# Altium PCB Bento_Pad_Plus_PCB.PcbDoc (part 3 of 3)
Units mm, origin at the board's own origin, x right, y up, seen from the top; angles counter-clockwise.
Board outline 279.4 x 81.28 mm, 2 copper layers (Top Layer, Bottom Layer), stack 1.57 mm thick; 149 components, 65 nets, 541 pads, 199 vias.
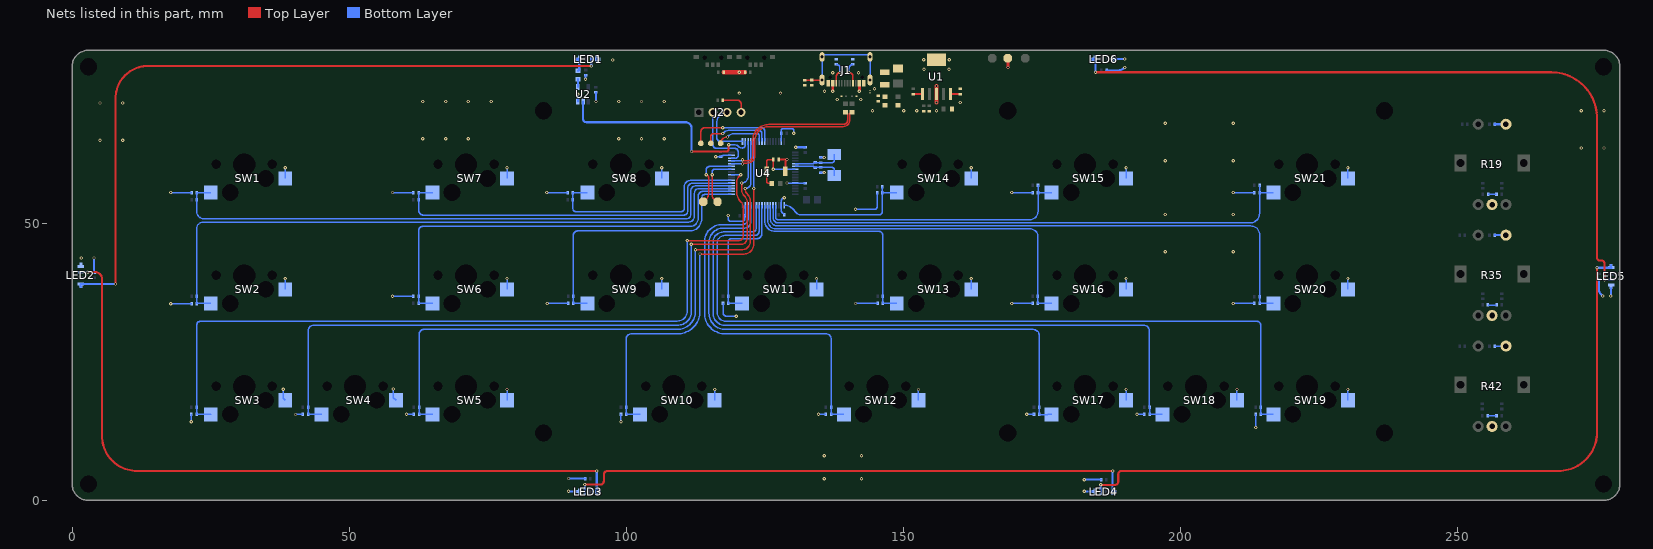
[diagram p2: the nets of this part, all layers, seen from the top]

## Via types
v1: diameter 0.6, hole 0.3, Top Layer to Bottom Layer, tented both sides, 199 vias

## Nets (pads, with @x,y where several pads share a name; then routed paths per layer and width w, separated by ;. In a path a pad name is that pad's centre, name@x,y a point inside that pad or via, vN(x,y) a via of type N, cw(c..) or ccw(c..) an arc to the next point about the centre after c; other vN are vias at no path point) (continued)
GND: C1.1 C2.2 C3.2 C4.1 C5.1 C6.1 C7.1 C8.1 C9.1 C10.1 C11.1 C12.1 C13.1 C14.1 C15.1 C16.1 C17.2 C18.2 C19.1 C20.1 C21.1 C22.1 C23.1 C24.1 C25.1 C26.1 C27.1 C28.1 C29.1 C30.1 C31.1 C32.1 C33.1 C34.1 C35.1 C36.1 C37.1 C38.1 C39.1 C40.1 C41.1 C42.1 C43.1 C44.1 C45.1 C46.1 C47.1 C48.1 C49.1 C50.1 C51.2 C53.2 C54.2 C57.2 C80.2 D1.2 D2.2 D3.2 J1.A1/B12 J1.B1/A12 J2.4 LED1.4 LED2.4 LED3.4 LED4.4 LED5.4 LED6.4 P3.1 R1.2 R2.2 R3.2 R7.2 R8.1 R19.C R19.W R35.C R35.W R42.C R42.W SW1.1 SW2.1 SW3.1 SW4.1 SW5.1 SW6.1 SW7.1 SW8.1 SW9.1 SW10.1 SW11.1 SW12.1 SW13.1 SW14.1 SW15.1 SW16.1 SW17.1 SW18.1 SW19.1 SW20.1 SW21.1 SW23.2 U1.3 U1.6 U2.3 U4.12 U4.18 U4.31 U4.47 U4.63 | length 185.1
  Top Layer w0.254: C13.1@117.564,72.263 120.091,72.263 cw(c120.091,71.591) 120.763,71.591 J2.4@120.763,70.053
  Top Layer w0.381: C80.2@127.525,61.545 v1(129.057,61.545) ccw(c129.788,60.815) 128.755,60.815 SW23.2@128.755,59.463
  Top Layer w0.508: v1(168.935,78.156) P3.1@168.935,79.781
  Top Layer w0.762: R8.1@117.609,77.292 v1(120.417,77.292) R7.2@121.477,77.292 ; v1(156.032,71.847) U1.3@156.032,73.354 ; U1.3@156.032,73.1 v1(156.032,74.803)
  Bottom Layer w0.254: v1(17.805,35.51) C16.1@21.589,35.51 ; v1(17.805,55.58) C15.1@21.589,55.58 ; v1(21.539,14.221) C25.1@21.539,15.54 ; v1(38.1,20.066) 38.1,18.455 SW3.1@38.475,18.08 ; SW2.1@38.475,38.1 v1(38.475,40.051) ; SW1.1@38.475,58.12 v1(38.475,60.071) ; v1(40.337,15.532) C26.1@41.656,15.532 ; v1(57.836,36.835) C28.1@61.62,36.835 ; v1(57.836,55.58) C29.1@61.62,55.58 ; v1(57.988,20.117) 57.988,18.586 SW4.1@58.494,18.08 ; v1(60.378,15.54) C27.1@61.697,15.54 ; SW5.1@78.515,18.08 v1(78.515,20.031) ; SW6.1@78.515,38.1 v1(78.515,40.051) ; SW7.1@78.515,58.12 v1(78.515,60.071) ; v1(85.674,55.58) C30.1@89.459,55.58 ; v1(85.775,35.56) C34.1@89.56,35.56 ; v1(99.085,14.221) C35.1@99.085,15.54 ; SW9.1@106.47,38.1 v1(106.47,40.051) ; SW8.1@106.47,58.12 v1(106.47,60.071) ; SW10.1@115.994,18.08 v1(115.994,20.031) ; v1(116.18,62.027) 116.18,62.036 C54.2@117.087,62.036 cw(c117.728,61.395) 117.728,62.301 U4.47@119.033,62.301 ; C36.1@117.5,35.56 117.5,33.96 ccw(c118.211,33.96) 118.211,33.249 v1(119.863,33.249) ; v1(118.439,51.431) 118.439,50.839 ccw(c118.885,50.839) 118.885,50.393 120.984,50.393 ccw(c120.984,50.852) 121.443,50.852 C53.2@121.443,51.431 ; C53.2@121.417,51.431 ccw(c121.417,51.547) 121.533,51.547 U4.31@121.533,53.301 ; U4.63@128.033,64.801 C51.2@128.033,66.544 ; C51.2@128.033,66.29 128.033,66.82 cw(c128.351,66.82) 128.351,67.137 129.965,67.137 cw(c129.965,66.852) 130.251,66.852 v1(130.251,66.29) ; C18.2@128.531,51.562 128.429,51.752 128.259,51.863 cw(c128.531,52.28) 128.033,52.28 U4.18@128.033,53.301 128.033,54.098 cw(c128.559,54.098) v1(128.559,54.624) ; v1(129.057,57.301) U4.12@130.533,57.301 132.263,57.301 ccw(c132.263,57.392) C57.2@132.327,57.328 ; SW11.1@134.383,38.1 v1(134.383,40.051) ; v1(134.749,15.54) C37.1@136.068,15.54 ; v1(141.402,35.56) 141.903,35.56 ; v1(141.402,52.545) 144.834,52.545 ccw(c144.834,53.025) 145.313,53.025 C39.1@145.313,55.58 ; v1@141.604,35.56 141.903,35.56 ; C38.1@145.389,35.56 141.903,35.56 ; SW12.1@152.774,18.08 v1(152.774,20.031) ; SW13.1@162.3,38.1 v1(162.3,40.051) ; SW14.1@162.3,58.12 v1(162.3,60.071) ; v1(169.596,35.56) C41.1@173.38,35.56 ; v1(169.632,55.58) C40.1@173.417,55.58 ; v1(172.316,15.54) C42.1@173.634,15.54 ; SW17.1@190.255,18.08 v1(190.255,20.031) ; SW16.1@190.255,38.1 v1(190.255,40.051) ; SW15.1@190.255,58.12 v1(190.255,60.071) ; v1(192.229,15.54) C43.1@193.548,15.54 ; v1(209.626,35.56) C45.1@213.411,35.56 ; v1(209.626,55.58) C46.1@213.411,55.58 ; SW18.1@210.275,18.08 v1(210.275,20.031) ; v1(213.639,13.157) C44.1@213.639,15.54 ; SW19.1@230.295,18.08 v1(230.295,20.031) ; SW20.1@230.295,38.1 v1(230.295,40.051) ; SW21.1@230.295,58.12 v1(230.295,60.071) ; C31.1@255.511,15.291 C33.1@257.111,15.291 ; C22.1@255.587,35.281 C24.1@257.111,35.281 ; C19.1@255.587,55.301 C21.1@257.111,55.301 ; C32.1@256.789,27.868 R42.W@258.819,27.868
  Bottom Layer w0.381: C11.1@3.968,41.13 v1(3.968,43.764) ; v1(89.611,1.637) LED3.4@91.073,1.637 ; v1(89.611,3.962) C12.1@92.634,3.962 ; U2.3@91.304,72.008 v1(91.304,73.308) ; v1(92.683,76.048) C10.1@92.683,76.759 ; v1(94.569,72.008) C9.1@94.569,73.668 ; LED1.4@94.708,79.718 ccw(c94.783,79.718) LED1.4@94.783,79.643 ; v1(130.632,63.754) 130.636,63.75 C17.2@132.327,63.75 ; C48.1@135.146,59.184 v1(135.763,59.184) ; C47.1@135.146,61.919 v1(135.763,61.919) ; v1(182.73,1.637) LED4.4@184.192,1.637 ; v1(182.73,3.759) C14.1@185.75,3.759 ; C50.1@186.741,77.622 188.704,77.622 ccw(c188.704,79.444) v1(189.992,78.156) ; LED6.4@187.827,79.718 ccw(c187.918,79.809) 187.918,79.681 v1(189.992,79.681) ; C23.1@256.789,47.888 R35.W@258.819,47.888 ; C20.1@256.789,67.908 R19.W@258.819,67.908 ; C49.1@275.488,39.94 275.592,39.94 275.615,39.916 275.615,38.044 ccw(c276.743,38.044) 275.946,37.247 v1(276.276,36.917) ; v1(277.763,36.917) LED5.4@277.763,38.379
  other v1: 135.763,3.937 142.493,3.937 135.763,8.047 142.493,8.047 1.637,43.764 197.312,44.878 209.626,44.878 197.312,51.608 209.626,51.608 197.312,61.342 209.626,61.342 272.415,63.628 276.525,63.628 5.034,65.025 9.144,65.025 63.317,65.278 67.427,65.278 71.537,65.278 98.679,65.278 102.789,65.278 106.899,65.278 197.312,68.072 209.626,68.072 144.482,70.333 150.147,70.333 152.479,70.333 156.032,70.333 272.415,70.358 276.525,70.358 5.034,71.755 9.144,71.755 160.325,71.847 63.317,72.008 67.427,72.008 71.537,72.008 75.647,72.008 98.679,72.008 102.789,72.008 106.899,72.008 138.108,72.362 142.351,72.362 120.417,73.533 127.889,73.533 135.833,73.89 144.831,74.295 137.308,77.216 141.949,77.216 153.767,77.813 158.297,77.813 97.612,79.502 153.746,79.554 158.318,79.554
LED_DO_3V3: U2.2 U4.50 | length 39.7
  Top Layer w0.381: v1(111.811,62.992) 118.11,62.992 ccw(c118.11,63.407) 118.525,63.407 v1(118.525,64.201)
  Bottom Layer w0.254: v1(118.525,64.201) 119.549,64.201 cw(c119.549,63.033) 120.375,63.859 120.376,63.858 120.377,63.857 ccw(c120.962,64.442) 120.962,63.615 ; 120.963,63.615 ccw(c120.962,64.186) 121.533,64.186 U4.50@121.533,64.801
  Bottom Layer w0.381: U2.2@92.254,72.008 92.254,68.858 ccw(c92.837,68.858) 92.837,68.275 110.744,68.275 cw(c110.744,67.208) 111.811,67.208 v1(111.811,62.992)
LED_DO_5V0: R39.1 U2.4 | length 1.4
  Bottom Layer w0.381: U2.4@91.304,74.608 R39.1@91.304,76.048
NetC1_2: C1.2 J1.S1 J1.S2 J1.S3 J1.S4 R1.1 | length 20.6
  Top Layer w0.254: C1.2@132.258,75.882 132.258,75.894 R1.1@133.488,75.894 J1.S1@135.383,75.894
  Bottom Layer w0.254: J1.S1@135.383,75.894 135.383,80.175 135.682,80.474 143.633,80.474 cw(c143.633,80.074) J1.S3@144.033,80.074 J1.S4@144.033,75.894
NetC7_2: C7.2 U1.5 | length 1.8
  Top Layer w0.381: U1.5@158.572,73.354 C7.2@160.325,73.354
NetF1_2: F1.2 FB1.1
NetJ1_A5: J1.A5 R2.1 | length 4.2
  Top Layer w0.254: v1(140.233,77.216) cw(c140.233,76.491) 140.958,76.491 J1.A5@140.958,75.324
  Bottom Layer w0.254: v1(140.233,77.216) 140.233,77.99 cw(c140.958,77.99) R2.1@140.958,78.715
NetJ1_B5: J1.B5 R3.1 | length 4.1
  Top Layer w0.254: J1.B5@137.958,75.324 137.958,76.566 cw(c138.608,76.566) v1(138.608,77.216)
  Bottom Layer w0.254: R3.1@137.958,78.715 cw(c137.958,78.065) 138.608,78.065 v1(138.608,77.216)
NetLED1_1: LED1.1 R39.2 | length 2.8
  Bottom Layer w0.381: LED1.1@91.073,79.643 91.483,79.643 ccw(c91.483,79.718) LED1.1@91.558,79.718 91.558,77.826 cw(c91.304,77.826) R39.2@91.304,77.572
NetLED1_3: LED1.3 LED2.1 | length 130.8
  Top Layer w0.381: v1(7.849,39.065) 7.849,72.577 cw(c13.707,72.577) 13.707,78.435 v1(93.708,78.435)
  Bottom Layer w0.381: LED2.1@1.637,38.58 cw(c1.637,38.655) 1.562,38.655 LED2.1@1.562,39.065 v1(7.849,39.065) ; v1(93.708,78.435) LED1.3@93.708,79.718
NetLED2_3: LED2.3 LED3.1 | length 130.1
  Top Layer w0.381: v1(2.819,41.215) 4.226,41.215 cw(c4.226,40.03) 5.41,40.03 5.41,11.648 ccw(c11.724,11.648) 11.724,5.334 v1(94.708,5.334)
  Bottom Layer w0.381: LED2.3@1.562,41.215 v1(2.819,41.215) ; v1(94.708,5.334) LED3.1@94.708,1.562 cw(c94.783,1.562) 94.783,1.637 LED3.1@95.193,1.637
NetLED3_3: LED3.3 LED4.1 | length 102.8
  Top Layer w0.381: v1(92.558,2.87) 95.377,2.87 ccw(c95.377,3.48) 95.987,3.48 95.987,4.674 cw(c96.647,4.674) 96.647,5.334 v1(187.827,5.334)
  Bottom Layer w0.381: LED3.3@92.558,1.562 v1(92.558,2.87) ; v1(187.827,5.334) LED4.1@187.827,1.562 cw(c187.902,1.562) 187.902,1.637 LED4.1@188.312,1.637
NetLED4_3: LED4.3 LED5.1 | length 129.7
  Top Layer w0.381: v1(185.674,2.819) 188.239,2.819 ccw(c188.239,3.429) 188.849,3.429 188.849,4.75 cw(c189.433,4.75) 189.433,5.334 268.317,5.334 ccw(c268.317,12.277) 275.26,12.277 v1(275.26,42.012)
  Bottom Layer w0.381: v1(185.674,2.819) 185.677,2.819 LED4.3@185.677,1.562 ; v1(275.26,42.012) 275.26,42.014 LED5.1@277.838,42.014 cw(c277.838,42.089) 277.763,42.089 LED5.1@277.763,42.499
NetLED5_3: LED5.3 LED6.1 | length 129.7
  Top Layer w0.381: v1@184.734,77.298 266.996,77.298 cw(c266.996,69.034) 275.26,69.034 275.26,43.828 ccw(c275.781,43.828) 275.781,43.307 276.097,43.307 cw(c276.097,42.798) 276.606,42.798 v1(276.606,39.864)
  Bottom Layer w0.381: LED6.1@184.192,79.643 LED6.1@184.734,79.643 ; LED6.1@184.677,79.643 LED6.1@184.734,79.643 ; LED6.1@184.677,79.718 cw(c184.677,79.661) LED6.1@184.734,79.661 ; v1(184.734,77.305) LED6.1@184.734,79.661 ; v1@276.555,39.864 LED5.3@277.838,39.864 ; LED6.1@184.734,79.643 LED6.1@184.734,79.661
NetR6_1: R6.1 U1.1 | length 1.7
  Top Layer w0.381: R6.1@151.83,73.354 U1.1@153.492,73.354
NetTP1_1: TP1.1 U4.55 | length 9.1
  Top Layer w0.254: TP1.1@117.081,64.457 cw(c118.221,64.457) 118.221,65.597 v1(118.307,65.597)
  Bottom Layer w0.254: v1(118.307,65.597) 118.452,65.741 cw(c119.633,64.56) 119.633,66.23 123.683,66.23 cw(c123.683,65.881) 124.033,65.881 U4.55@124.033,64.801
NetTP2_1: TP2.1 U4.56 | length 12.7
  Top Layer w0.254: TP2.1@115.291,64.457 115.291,65.659 cw(c115.862,65.659) 115.862,66.23 v1(117.47,66.23)
  Bottom Layer w0.254: v1(117.47,66.23) 117.744,66.505 cw(c118.433,65.817) 118.433,66.79 123.948,66.79 cw(c123.948,66.205) 124.533,66.205 U4.56@124.533,64.801
NetTP3_1: TP3.1 U4.57 | length 16.3
  Top Layer w0.254: TP3.1@113.5,64.457 113.5,66.54 cw(c114.244,66.54) 114.244,67.285 v1(117.47,67.285)
  Bottom Layer w0.254: v1(117.47,67.285) 124.421,67.285 cw(c124.421,66.673) 125.033,66.673 U4.57@125.033,64.801
OSC_IN: C47.2 R38.1 U4.5 X1.1 | length 8.4
  Bottom Layer w0.254: U4.5@130.533,60.801 133.754,60.801 ccw(c133.754,61.021) 133.849,60.823 133.902,60.876 133.946,60.92 R38.1@134.13,61.021 134.172,60.979 C47.2@135.146,60.979 137.128,60.979 ccw(c137.128,61.435) 137.584,61.435 X1.1@137.584,62.451
OSC_OUT: C48.2 R38.2 U4.6 X1.2 | length 8.5
  Bottom Layer w0.254: U4.6@130.533,60.301 133.754,60.301 cw(c133.754,60.081) 133.849,60.28 133.902,60.227 133.946,60.183 R38.2@134.13,60.081 ; X1.2@137.584,58.651 137.584,59.667 ccw(c137.128,59.667) 137.128,60.124 R38.2@134.172,60.124 ; R38.2@134.13,60.081 R38.2@134.172,60.124 ; R38.2@134.13,60.081 R38.2@134.172,60.124
RST: C80.1 R47.2 SW23.1 U4.7 | length 11.8
  Top Layer w0.254: R47.2@126.293,57.252 125.799,57.252 cw(c125.799,57.696) 125.355,57.696 SW23.1@125.355,59.463 125.355,61.098 cw(c125.802,61.098) 125.802,61.545 C80.1@126.585,61.545 v1(126.585,59.801)
  Bottom Layer w0.254: v1@126.533,59.801 U4.7@130.533,59.801
RX: P5.1 U4.43 | length 11.9
  Top Layer w0.254: P5.1@113.944,53.899 114.398,54.409 ccw(c113.944,55.232) 114.884,55.232 114.884,58.369 ; 114.884,58.369 ccw(c114.478,58.369) v1(114.478,58.776) cw(c114.478,58.369) 114.884,58.369
  Bottom Layer w0.254: v1(114.478,58.776) 114.478,59.693 cw(c115.086,59.693) 115.086,60.301 U4.43@119.033,60.301
SW#1: C15.2 R11.2 SW1.2 U4.36 | length 108.4
  Bottom Layer w0.254: SW1.2@25.025,55.58 C15.2@22.529,55.58 R11.2@22.529,54.305 22.529,52.045 ccw(c23.704,52.045) 23.704,50.87 110.985,50.87 ccw(c110.985,51.544) 111.658,51.544 111.658,55.795 cw(c112.665,55.795) 112.665,56.801 U4.36@119.033,56.801
SW#2: C16.2 R12.2 SW2.2 U4.35 | length 118.5
  Bottom Layer w0.254: SW2.2@25.025,35.56 22.579,35.56 ccw(c22.579,35.51) C16.2@22.529,35.51 R12.2@22.529,36.835 22.529,49.148 cw(c23.592,49.148) 23.592,50.211 111.166,50.211 ccw(c111.166,51.389) 112.344,51.389 112.344,55.466 cw(c113.179,55.466) 113.179,56.301 U4.35@119.033,56.301
SW#3: C25.2 R13.2 SW3.2 U4.40 | length 145.3
  Top Layer w0.254: v1(111.047,46.91) 120.347,46.91 ccw(c120.347,47.721) 121.158,47.721 121.158,52.848 ccw(c119.746,52.848) 120.745,53.846 120.664,53.927 120.663,53.928 cw(c122.268,55.534) 119.998,55.534 ; 119.998,55.535 119.998,57.59 cw(c121.223,57.59) 120.357,58.457 v1(120.701,58.801)
  Bottom Layer w0.254: SW3.2@25,15.515 cw(c25.025,15.515) SW3.2@25.025,15.54 C25.2@22.479,15.54 R13.2@22.479,16.815 22.479,31.572 cw(c23.292,31.572) 23.292,32.385 109.279,32.385 ccw(c109.279,34.137) 111.031,34.137 111.031,46.91 v1(111.047,46.91) ; U4.40@119.033,58.801 v1@120.701,58.801
SW#4: C26.2 R14.2 SW4.2 U4.51 | length 129.9
  Top Layer w0.254: v1(111.793,46.228) 120.77,46.228 ccw(c120.77,47.302) 121.844,47.302 121.844,53.899 ccw(c120.372,53.899) 121.413,54.939 121.285,55.067 cw(c122.275,56.057) 120.875,56.057 v1(120.875,57.309)
  Bottom Layer w0.254: C26.2@42.596,15.532 R14.2@42.596,16.805 42.596,30.607 cw(c43.612,30.607) 43.612,31.623 109.279,31.623 ccw(c109.279,34.137) 111.793,34.137 v1(111.793,46.228) ; C26.2@42.596,15.54 SW4.2@45.044,15.54 ; v1(120.875,57.309) ccw(c120.875,58.467) 122.033,58.467 U4.51@122.033,64.801
SW#5: C27.2 R9.2 SW5.2 U4.52 | length 109.9
  Top Layer w0.254: v1(112.531,45.252) 120.901,45.252 ccw(c120.901,46.805) 122.453,46.805 122.453,53.909 ccw(c120.372,53.909) 121.844,55.381 cw(c122.594,56.131) 121.533,56.131 v1(121.533,56.301)
  Bottom Layer w0.254: SW5.2@65.065,15.54 C27.2@62.636,15.54 R9.2@62.636,16.815 62.636,29.972 cw(c63.546,29.972) 63.546,30.882 109.279,30.882 ccw(c109.279,34.137) 112.534,34.137 v1@112.534,45.252 ; v1(121.533,56.301) ccw(c121.533,57.301) 122.533,57.301 U4.52@122.533,64.801
SW#6: C28.2 R17.2 SW6.2 U4.34 | length 78
  Bottom Layer w0.254: SW6.2@65.065,35.56 62.61,35.56 ccw(c62.61,35.51) 62.56,35.51 R17.2@62.56,35.56 C28.2@62.56,36.835 62.56,48.768 cw(c63.246,48.768) 63.246,49.454 111.587,49.454 ccw(c111.587,50.871) 113.005,50.871 113.005,54.866 cw(c113.94,54.866) 113.94,55.801 U4.34@119.033,55.801
SW#7: C29.2 R10.2 SW7.2 U4.37 | length 67.8
  Bottom Layer w0.254: SW7.2@65.065,55.58 C29.2@62.56,55.58 R10.2@62.56,54.305 62.56,52.4 ccw(c63.458,52.4) 63.458,51.503 110.425,51.503 ccw(c110.425,52.178) 111.1,52.178 111.1,56.335 cw(c112.066,56.335) 112.066,57.301 U4.37@119.033,57.301
SW#8: C30.2 R18.2 SW8.2 U4.38 | length 39.4
  Bottom Layer w0.254: SW8.2@93.02,55.58 C30.2@90.399,55.58 R18.2@90.399,54.305 90.399,52.705 ccw(c90.998,52.705) 90.998,52.106 109.891,52.106 ccw(c109.891,52.705) 110.49,52.705 110.49,56.543 cw(c111.749,56.543) 111.749,57.801 U4.38@119.033,57.801
SW#9: C34.2 R21.2 SW9.2 U4.33 | length 49.2
  Bottom Layer w0.254: SW9.2@93.02,35.56 C34.2@90.499,35.56 R21.2@90.499,36.835 90.499,47.929 cw(c91.211,47.929) 91.211,48.641 111.475,48.641 ccw(c111.475,50.805) 113.64,50.805 113.64,54.506 cw(c114.435,54.506) 114.435,55.301 U4.33@119.033,55.301
SW#10: C35.2 R22.2 SW10.2 U4.53 | length 71.9
  Top Layer w0.254: v1(113.335,44.475) 121.31,44.475 ccw(c121.31,46.198) 123.033,46.198 v1(123.033,56.301)
  Bottom Layer w0.254: SW10.2@102.544,15.54 C35.2@100.025,15.54 R22.2@100.025,16.815 100.025,29.134 cw(c100.973,29.134) 100.973,30.082 109.279,30.082 ccw(c109.279,34.137) 113.334,34.137 v1(113.335,44.475) ; v1(123.033,56.301) U4.53@123.033,64.801
SW#11: C36.2 R28.2 SW11.2 U4.25 | length 25.7
  Bottom Layer w0.254: SW11.2@120.933,35.56 C36.2@118.439,35.56 118.439,46.735 cw(c118.948,46.735) 118.948,47.244 123.577,47.244 ccw(c123.577,48.2) 124.533,48.2 U4.25@124.533,53.301
SW#12: C37.2 R29.2 SW12.2 U4.30 | length 67
  Bottom Layer w0.254: U4.30@122.033,53.301 122.033,50.839 cw(c120.984,50.839) 120.984,49.79 117.303,49.79 ccw(c117.303,46.657) 114.17,46.657 114.17,33.811 ccw(c117.91,33.811) 117.91,30.072 136.085,30.072 cw(c136.085,29.124) 137.033,29.124 R29.2@137.033,16.805 ; R29.2@137.008,16.815 C37.2@137.008,15.54 SW12.2@139.324,15.54
SW#13: C38.2 R30.2 SW13.2 U4.24 | length 40.4
  Bottom Layer w0.254: U4.24@125.033,53.301 125.033,50.391 ccw(c126.834,50.391) 126.834,48.59 145.583,48.59 cw(c145.583,47.845) 146.329,47.845 R30.2@146.329,36.835 C38.2@146.329,35.585 ; C38.2@146.329,35.56 SW13.2@148.85,35.56
SW#14: C39.2 R25.2 SW14.2 U4.17 | length 25.7
  Bottom Layer w0.254: U4.17@128.533,53.301 cw(c128.533,51.273) 129.967,52.707 130.795,51.879 ccw(c131.561,52.646) 131.561,51.562 145.709,51.562 ccw(c145.709,52.106) 146.253,52.106 R25.2@146.253,56.622 ; C39.2@146.329,55.58 SW14.2@148.85,55.58
SW#15: C40.2 R23.2 SW15.2 U4.20 | length 57.8
  Bottom Layer w0.254: U4.20@127.033,53.301 127.015,53.301 127.015,51.052 ccw(c127.369,51.052) 127.369,50.698 172.892,50.698 ccw(c172.892,52.163) 174.357,52.163 R23.2@174.357,56.855 ; C40.2@174.357,55.58 SW15.2@176.805,55.58
SW#16: C41.2 R26.2 SW16.2 U4.23 | length 67.8
  Bottom Layer w0.254: U4.23@125.533,53.301 125.533,50.616 ccw(c127.126,50.616) 127.126,49.022 172.973,49.022 cw(c172.973,47.675) 174.32,47.675 R26.2@174.32,36.835 C41.2@174.32,35.56 SW16.2@176.805,35.56
SW#17: C42.2 R24.2 SW17.2 U4.29 | length 103.9
  Bottom Layer w0.254: U4.29@122.533,53.301 122.533,50.393 cw(c121.289,50.393) 121.289,49.149 117.536,49.149 ccw(c117.536,46.583) 114.97,46.583 114.97,33.811 ccw(c117.91,33.811) 117.91,30.872 173.512,30.872 cw(c173.512,29.81) 174.574,29.81 R24.2@174.574,16.815 C42.2@174.574,15.54 ccw(c174.671,15.54) 174.671,15.443 176.073,15.443 cw(c176.17,15.443) 176.17,15.54 SW17.2@176.805,15.54
SW#18: C43.2 R31.2 SW18.2 U4.27 | length 124.1
  Bottom Layer w0.254: U4.27@123.533,53.301 123.533,49.276 cw(c122.72,49.276) 122.72,48.463 117.587,48.463 ccw(c117.587,46.588) 115.711,46.588 115.711,33.811 ccw(c117.91,33.811) 117.91,31.613 193.446,31.613 cw(c193.446,30.597) 194.462,30.597 R31.2@194.462,16.795 ; R31.2@194.488,16.805 C43.2@194.488,15.54 SW18.2@196.825,15.54
SW#19: C44.2 R32.2 SW19.2 U4.26 | length 143.8
  Bottom Layer w0.254: U4.26@124.033,53.301 124.033,48.646 cw(c123.215,48.646) 123.215,47.828 117.79,47.828 ccw(c117.79,46.511) 116.473,46.511 116.473,33.811 ccw(c117.91,33.811) 117.91,32.375 213.766,32.375 cw(c213.766,31.562) 214.579,31.562 R32.2@214.579,16.805 C44.2@214.579,15.54 SW19.2@216.845,15.54
SW#20: C45.2 R37.2 SW20.2 U4.22 | length 107.3
  Bottom Layer w0.254: U4.22@126.033,53.301 126.033,50.839 ccw(c127.316,50.839) 127.316,49.555 212.767,49.555 cw(c212.767,47.972) 214.351,47.972 R37.2@214.351,36.735 C45.2@214.351,35.56 SW20.2@216.845,35.56
SW#21: C46.2 R27.2 SW21.2 U4.21 | length 99.1
  Bottom Layer w0.254: U4.21@126.533,53.301 126.533,51.013 ccw(c127.429,51.013) 127.429,50.116 212.664,50.116 ccw(c212.664,51.803) 214.351,51.803 C46.2@214.351,55.58 ; R27.2@214.351,56.855 C46.2@214.351,55.58 ; SW21.2@216.845,55.58 C46.2@214.351,55.58
SWDCLK: J2.3 U4.49 | length 10.7
  Bottom Layer w0.254: J2.3@118.223,70.053 ccw(c118.223,68.203) 116.373,68.203 116.373,65.528 ccw(c117.1,65.528) 117.1,64.801 120.763,64.801 120.898,64.801 U4.49@121.033,64.801
SWDIO: J2.2 U4.46 | length 13.3
  Bottom Layer w0.254: J2.2@115.683,70.053 115.683,64.201 ccw(c116.325,64.201) 116.325,63.559 119.635,63.559 cw(c119.635,62.976) 120.218,62.976 120.218,62.21 cw(c119.81,62.21) 119.81,61.801 U4.46@119.033,61.801
TX: P4.1 U4.42 | length 9.6
  Top Layer w0.254: v1(115.545,58.776) 115.545,55.119 ccw(c116.51,55.119) 115.827,54.436 115.956,54.308 P4.1@116.51,53.899
  Bottom Layer w0.254: v1(115.545,58.776) 115.545,59.348 cw(c115.998,59.348) 115.998,59.801 U4.42@119.033,59.801
USB_D_N: R4.2 U4.44 | length 28.7
  Top Layer w0.254: v1(121.031,60.724) cw(c121.217,60.724) 121.217,60.909 121.918,60.909 ccw(c121.918,62.236) 123.245,62.236 123.245,64.948 cw(c125.785,64.948) 125.785,67.488 139.196,67.488 ccw(c139.196,68.682) 140.39,68.682 140.39,69.657 cw(c140.811,69.657) R4.2@140.811,70.079
  Bottom Layer w0.254: U4.44@119.033,60.801 120.953,60.801 cw(c120.953,60.724) v1(121.031,60.724)
USB_D_P: R5.2 U4.45 | length 28.2
  Top Layer w0.254: v1(121.031,61.476) ccw(c121.217,61.476) 121.217,61.29 121.918,61.29 ccw(c121.918,62.236) 122.864,62.236 122.864,64.948 cw(c125.785,64.948) 125.785,67.869 139.196,67.869 ccw(c139.196,68.682) 140.009,68.682 140.009,69.657 ccw(c139.587,69.657) R5.2@139.587,70.079
  Bottom Layer w0.254: U4.45@119.033,61.301 120.856,61.301 ccw(c120.856,61.476) v1(121.031,61.476)
VBUS: C2.1 C3.1 D1.1 F1.1 J1.A4/B9 J1.B4/A9 | length 2.9
  Top Layer w0.508: v1(137.308,73.89) J1.B4/A9@137.308,75.324 ; v1(142.108,73.89) J1.A4/B9@142.108,75.324
pads on no net: J1.A8 J1.B8 J1.MH LED6.3 R19.MH1 R19.MH2 R35.MH1 R35.MH2 R42.MH1 R42.MH2 SW1. SW2. SW3. SW4. SW5. SW6. SW7. SW8. SW9. SW10. SW11. SW12. SW13. SW14. SW15. SW16. SW17. SW18. SW19. SW20. SW21. SW22.2 SW22.4 SW22.5 SW22.MH SW24.2 SW24.4 SW24.5 SW24.MH U2.1 U4.2 U4.3 U4.4 U4.14 U4.39 U4.41 U4.54 U4.62

## Polygon pours and split planes (outlines as drawn)
5V on Top Layer "5V_L01_P004" (solid, pour order 4): 148.175,75.955 150.32,75.955 ccw(c150.32,76.155) 150.52,76.155 150.52,76.683 cw(c150.749,76.683) 150.749,76.911 154.859,76.911 cw(c154.859,76.454) 155.317,76.454 155.317,70.823 153.137,70.823 153.137,71.551 154.227,71.551 154.227,74.796 ccw(c153.767,74.796) 153.767,75.255 153.157,75.255 ccw(c153.157,74.854) 152.756,74.854 152.756,74.244 cw(c152.603,74.244) 152.603,74.092 150.397,74.092 ccw(c150.397,73.69) 149.995,73.69 149.995,72.492 148.175,72.492
GND on Top Layer "GND_L01_P003" (solid, remove dead copper, pour order 3): 0,2.997 0,78.283 cw(c2.997,78.283) 2.997,81.28 276.403,81.28 cw(c276.403,78.283) 279.4,78.283 279.4,2.997 cw(c276.403,2.997) 276.403,0 2.997,0 cw(c2.997,2.997)
VBUS on Top Layer "VBUS_L01_P000" (solid, pour order 0): 141.808,74.09 143.008,74.09 143.408,73.69 145.87,73.69 145.876,75.555 147.573,75.555 147.573,72.492 143.037,72.492 142.089,73.439 141.808,73.439
GND on Bottom Layer "GND_L02_P002" (solid, remove dead copper, pour order 2): 0,2.997 0,78.283 cw(c2.997,78.283) 2.997,81.28 276.403,81.28 cw(c276.403,78.283) 279.4,78.283 279.4,2.997 cw(c276.403,2.997) 276.403,0 2.997,0 cw(c2.997,2.997)

## Other copper
Top Layer:
  rectangle net 5V: 153.137,70.823 155.317,71.551
  rectangle net 5V: 148.175,72.492 149.995,75.955
  rectangle net NetF1_2: 145.843,76.755 149.995,78.675
  region net 3V3: 23.636,28.5 cw(c24.906,28.5) 24.906,29.77 37.734,29.77 cw(c37.734,28.5) 39.004,28.5 39.004,17.404 ccw(c40.274,17.404) 40.274,16.134 42.386,16.134 ccw(c42.386,17.404) 43.656,17.404 43.656,28.5 cw(c44.926,28.5) 44.926,29.77 57.754,29.77 cw(c57.754,28.5) 59.024,28.5 59.024,17.404 ccw(c60.294,17.404) 60.294,16.134 62.406,16.134 ccw(c62.406,17.404) 63.676,17.404 63.676,28.5 cw(c64.946,28.5) 64.946,29.77 95.234,29.77 cw(c95.234,28.5) 96.504,28.5 96.504,17.404 ccw(c97.774,17.404) 97.774,16.134 99.885,16.134 ccw(c99.885,17.404) 101.155,17.404 101.155,28.5 cw(c102.425,28.5) 102.425,29.77 131.959,29.77 cw(c131.959,28.444) 133.284,28.444 133.284,17.349 ccw(c134.554,17.349) 134.554,16.079 136.666,16.079 ccw(c136.666,17.349) 137.936,17.349 137.936,28.444 cw(c139.206,28.444) 139.206,29.714 169.494,29.714 cw(c169.494,28.444) 170.764,28.444 170.764,17.349 ccw(c172.034,17.349) 172.034,16.079 174.145,16.079 ccw(c174.145,17.349) 175.415,17.349 175.415,28.444 cw(c176.685,28.444) 176.685,29.714 189.515,29.714 cw(c189.515,28.444) 190.785,28.444 190.785,17.349 ccw(c192.055,17.349) 192.055,16.079 194.166,16.079 ccw(c194.166,17.349) 195.436,17.349 195.436,28.444 cw(c196.706,28.444) 196.706,29.714 209.509,29.714 cw(c209.509,28.419) 210.804,28.419 210.804,17.323 ccw(c212.074,17.323) 212.074,16.053 214.07,16.053 ccw(c214.07,17.44) 215.456,17.44 215.456,58.09 ccw(c214.186,58.09) 214.186,59.36 212.075,59.36 ccw(c212.075,58.09) 210.805,58.09 210.805,33.66 cw(c209.535,33.66) 209.535,32.39 176.711,32.39 cw(c176.711,33.66) 175.441,33.66 175.441,58.09 ccw(c174.171,58.09) 174.171,59.36 172.06,59.36 ccw(c172.06,58.09) 170.79,58.09 170.79,33.66 cw(c169.52,33.66) 169.52,32.39 148.02,32.39 cw(c148.02,33.66) 146.75,33.66 146.75,58.09 ccw(c145.48,58.09) 145.48,59.36 143.369,59.36 ccw(c143.369,58.09) 142.099,58.09 142.099,33.66 cw(c140.829,33.66) 140.829,32.39 92.901,32.39 cw(c92.901,33.66) 91.631,33.66 91.631,58.09 ccw(c90.361,58.09) 90.361,59.36 88.25,59.36 ccw(c88.25,58.09) 86.98,58.09 86.98,33.66 cw(c85.71,33.66) 85.71,32.39 64.921,32.39 cw(c64.921,33.66) 63.651,33.66 63.651,58.09 ccw(c62.381,58.09) 62.381,59.36 60.27,59.36 ccw(c60.27,58.09) 59,58.09 59,33.66 cw(c57.73,33.66) 57.73,32.39 24.906,32.39 cw(c24.906,33.66) 23.636,33.66 23.636,58.09 ccw(c22.366,58.09) 22.366,59.36 20.255,59.36 ccw(c20.255,58.09) 18.985,58.09 18.985,17.404 18.984,17.404 ccw(c20.254,17.404) 20.254,16.134 22.25,16.134 ccw(c22.25,17.52) 23.636,17.52
Bottom Layer:
  rectangle net VBUS: 136.818,73.203 142.57,74.422
  rectangle net 3V3#: 131.844,53.62 133.164,56.617
Multi-Layer:
  pour cut-out: 239.888,12.192 cw(c236.888,12.192) 236.888,9.192 cw(c236.888,12.192) 233.888,12.192 cw(c236.888,12.192) 236.888,15.192 cw(c236.888,12.192)
  pour cut-out: 239.888,70.358 ccw(c236.888,70.358) 236.888,73.358 ccw(c236.888,70.358) 233.888,70.358 ccw(c236.888,70.358) 236.888,67.358 ccw(c236.888,70.358)
  pour cut-out: 165.892,70.358 cw(c168.892,70.358) 168.892,73.358 cw(c168.892,70.358) 171.892,70.358 cw(c168.892,70.358) 168.892,67.358 cw(c168.892,70.358)
  pour cut-out: 165.892,12.192 ccw(c168.892,12.192) 168.892,9.192 ccw(c168.892,12.192) 171.892,12.192 ccw(c168.892,12.192) 168.892,15.192 ccw(c168.892,12.192)
  pour cut-out: 88.108,70.358 ccw(c85.108,70.358) 85.108,73.358 ccw(c85.108,70.358) 82.108,70.358 ccw(c85.108,70.358) 85.108,67.358 ccw(c85.108,70.358)
  pour cut-out: 88.108,12.192 cw(c85.108,12.192) 85.108,9.192 cw(c85.108,12.192) 82.108,12.192 cw(c85.108,12.192) 85.108,15.192 cw(c85.108,12.192)
  pour cut-out: -0.003,2.997 ccw(c2.997,2.997) 2.997,-0.003 ccw(c2.997,2.997) 5.997,2.997 ccw(c2.997,2.997) 2.997,5.997 ccw(c2.997,2.997)
  pour cut-out: 276.403,-0.003 ccw(c276.403,2.997) 279.403,2.997 ccw(c276.403,2.997) 276.403,5.997 ccw(c276.403,2.997) 273.403,2.997 ccw(c276.403,2.997)
  pour cut-out: 279.403,78.283 ccw(c276.403,78.283) 276.403,81.283 ccw(c276.403,78.283) 273.403,78.283 ccw(c276.403,78.283) 276.403,75.283 ccw(c276.403,78.283)
  pour cut-out: 2.997,81.283 ccw(c2.997,78.283) -0.003,78.283 ccw(c2.997,78.283) 2.997,75.283 ccw(c2.997,78.283) 5.997,78.283 ccw(c2.997,78.283)

## Silkscreen, mask and mechanical layers (free items; w line width, h text height)
Top Overlay:
  lines w0.254: 145.915,68.656 145.915,51.66 163.915,51.66 163.915,69.66 148.006,69.66 ; 22.09,11.62 40.09,11.62 40.09,29.62 22.09,29.62 22.09,11.62 ; 22.09,31.64 40.09,31.64 40.09,49.64 22.09,49.64 22.09,31.64 ; 22.09,51.66 40.09,51.66 40.09,69.66 22.09,69.66 22.09,51.66 ; 42.109,11.62 60.109,11.62 60.109,29.62 42.109,29.62 42.109,11.62 ; 62.13,11.62 80.13,11.62 80.13,29.62 62.13,29.62 62.13,11.62 ; 62.13,31.64 80.13,31.64 80.13,49.64 62.13,49.64 62.13,31.64 ; 62.13,51.66 80.13,51.66 80.13,69.66 62.13,69.66 62.13,51.66 ; 90.085,31.64 108.085,31.64 108.085,49.64 90.085,49.64 90.085,31.64 ; 90.085,51.66 108.085,51.66 108.085,69.66 90.085,69.66 90.085,51.66 ; 99.609,11.62 117.609,11.62 117.609,29.62 99.609,29.62 99.609,11.62 ; 117.998,31.64 135.998,31.64 135.998,49.64 117.998,49.64 117.998,31.64 ; 136.389,11.62 154.389,11.62 154.389,29.62 136.389,29.62 136.389,11.62 ; 145.915,31.64 163.915,31.64 163.915,49.64 145.915,49.64 145.915,31.64 ; 173.87,11.62 191.87,11.62 191.87,29.62 173.87,29.62 173.87,11.62 ; 173.87,31.64 191.87,31.64 191.87,49.64 173.87,49.64 173.87,31.64 ; 173.87,51.66 191.87,51.66 191.87,69.66 173.87,69.66 173.87,51.66 ; 193.889,11.62 211.889,11.62 211.889,29.62 193.889,29.62 193.889,11.62 ; 213.91,11.62 231.91,11.62 231.91,29.62 213.91,29.62 213.91,11.62 ; 213.91,31.64 231.91,31.64 231.91,49.64 213.91,49.64 213.91,31.64 ; 213.91,51.66 231.91,51.66 231.91,69.66 213.91,69.66 213.91,51.66
  text "Bento Pad Plus V1.0" at 58.058,78.658 h1.52
  text "BOOT-1" at 112.875,75.031 h1.52
  text "BOOT-0" at 120.318,75.031 h1.52
  text "GND" at 169.309,74.695 h1.52 r90
  text "3V3" at 172.7,74.492 h1.52 r90
  text "5V" at 166.705,74.441 h1.52 r90
  text "RESET" at 129.595,58.808 h1.52
  text "RX" at 114.351,50.724 h1.52 r90
  text "TX" at 116.916,50.724 h1.52 r90
Bottom Overlay:
  lines w0.127: 134.13,61.339 134.13,62.258
Board Outline:
  the board outline again, w0.254
Fabrication:
  drawing of 191 lines, arcs and shapes, not listed
  text "Layer" at 302.402,79.502 h1.52
  text "Name" at 312.813,79.502 h1.52
  text "Material" at 336.429,79.502 h1.52
  text "Thickness" at 358.267,79.502 h1.52
  text "Constant" at 374.773,79.502 h1.52
  text "Board Layer Stack" at 389.247,79.502 h1.52
  text "Top Overlay" at 312.813,76.454 h1.52
  text "Top Solder" at 312.813,73.406 h1.52
  text "Solder Resist" at 336.429,73.406 h1.52
  text "0.010mm" at 358.267,73.406 h1.52
  text "3.5" at 374.773,73.406 h1.52
  text "1" at 302.402,70.358 h1.52
  text "Top Layer" at 312.813,70.358 h1.52
  text "0.035mm" at 358.267,70.358 h1.52
  text "Dielectric 1" at 312.813,67.31 h1.52
  text "FR-4" at 336.429,67.31 h1.52
  text "1.500mm" at 358.267,67.31 h1.52
  text "4.8" at 374.773,67.31 h1.52
  text "2" at 302.402,64.262 h1.52
  text "Bottom Layer" at 312.813,64.262 h1.52
  text "0.035mm" at 358.267,64.262 h1.52
  text "Bottom Solder" at 312.813,61.214 h1.52
  text "Solder Resist" at 336.429,61.214 h1.52
  text "0.010mm" at 358.267,61.214 h1.52
  text "3.5" at 374.773,61.214 h1.52
  text "Bottom Overlay" at 312.813,58.166 h1.52
  text "Total board thickness:" at 302.402,55.118 h1.52
  text "1.590mm" at 358.267,55.118 h1.52
Drill Drawing:
  circle w0.254: c2.556,156.268 r0.847
  circle w0.254: c2.556,148.648 r0.508
  circle w0.254: c2.556,148.648 r0.847
  lines w0.254: 1.709,117.321 1.709,117.744 2.133,118.168 1.709,118.591 1.709,119.014 2.133,119.014 2.556,118.591 2.979,119.014 3.403,119.014 3.403,118.591 2.979,118.168 3.403,117.744 3.403,117.321 2.979,117.321 2.556,117.744 2.133,117.321 1.709,117.321 ; 1.709,121.131 2.556,121.554 3.403,121.131 2.979,121.978 3.403,122.824 2.556,122.401 1.709,122.824 2.133,121.978 1.709,121.131 ; 1.709,126.634 3.403,126.634 2.556,124.941 1.709,126.634 ; 1.709,129.174 2.133,129.174 2.556,128.751 2.979,129.174 3.403,129.174 2.979,129.598 3.403,130.021 2.979,130.021 2.556,130.444 2.133,130.021 1.709,130.021 2.133,129.598 1.709,129.174 ; 1.709,132.561 3.403,132.561 3.403,134.254 1.709,134.254 1.709,132.561 ; 1.709,136.794 2.133,136.794 2.133,136.371 2.979,136.371 2.979,136.794 3.403,136.794 3.403,137.641 2.979,137.641 2.979,138.064 2.133,138.064 2.133,137.641 1.709,137.641 1.709,136.794 ; 1.709,141.028 2.556,140.181 3.403,141.028 2.556,141.874 1.709,141.028 ; 1.709,144.414 2.133,144.414 2.556,143.991 2.979,144.414 3.403,144.414 2.979,144.838 3.403,145.261 2.979,145.261 2.556,145.684 2.133,145.261 1.709,145.261 2.133,144.838 1.709,144.414 ; 1.709,153.304 3.403,153.304 2.556,151.611 1.709,153.304 ; 1.709,159.231 3.403,159.231 3.403,160.924 1.709,160.924 1.709,159.231 ; 2.048,126.296 3.064,126.296 2.556,125.28 2.048,126.296 ; 2.048,129.344 2.302,129.344 2.556,129.09 2.81,129.344 3.064,129.344 2.81,129.598 3.064,129.852 2.81,129.852 2.556,130.106 2.302,129.852 2.048,129.852 2.302,129.598 2.048,129.344 ; 2.048,132.9 3.064,132.9 3.064,133.916 2.048,133.916 2.048,132.9
  lines w0.381: 0.191,116.178 350.154,116.178 ; 0.191,161.898 350.154,161.898 ; 14.183,112.368 14.183,165.708 ; 29.419,112.368 29.419,165.708 ; 58.62,112.368 58.62,165.708 ; 71.469,112.368 71.469,165.708 ; 90.108,112.368 90.108,165.708 ; 128.197,112.368 128.197,165.708 ; 143.179,112.368 143.179,165.708 ; 162.122,112.368 162.122,165.708 ; 197.417,112.368 197.417,165.708 ; 219.103,112.368 219.103,165.708 ; 252.977,112.368 252.977,165.708 ; 286.85,112.368 286.85,165.708 ; 314.528,112.368 314.528,165.708 ; 0.191,112.368 350.154,112.368 350.154,165.708 0.191,165.708 0.191,112.368
  text "Symbol" at 2.476,163.041 h1.83
  text "Count" at 15.326,163.041 h1.83
  text "Hole Size" at 30.562,163.041 h1.83
  text "Plated" at 59.763,163.041 h1.83
  text "Hole Type" at 72.612,163.041 h1.83
  text "Drill Layer Pair" at 91.251,163.041 h1.83
  text "Via/Pad" at 129.34,163.041 h1.83
  text "Pad Shape" at 144.322,163.041 h1.83
  text "Template" at 163.265,163.041 h1.83
  text "Description" at 198.56,163.041 h1.83
  text "Hole Tolerance (+)" at 220.246,163.041 h1.83
  text "Hole Tolerance (-)" at 254.12,163.041 h1.83
  text "Hole Length" at 287.993,163.041 h1.83
  text "Routed Path Length" at 315.671,163.041 h1.83
  text "2" at 15.326,159.231 h1.52
  text "23.62mil (0.600mm)" at 30.562,159.231 h1.52
  text "PTH" at 59.763,159.231 h1.52
  text "Slot" at 72.612,159.231 h1.52
  text "Top Layer - Bottom Layer" at 91.251,159.231 h1.52
  text "Pad" at 129.34,159.231 h1.52
  text "Rounded" at 144.322,159.231 h1.52
  text "r90_170h60_140r45m0mx0" at 163.265,159.231 h1.52
  text "55.12mil (1.400mm)" at 287.993,159.231 h1.52
  text "31.50mil (0.800mm)" at 315.671,159.231 h1.52
  text "2" at 15.326,155.421 h1.52
  text "23.62mil (0.600mm)" at 30.562,155.421 h1.52
  text "PTH" at 59.763,155.421 h1.52
  text "Slot" at 72.612,155.421 h1.52
  text "Top Layer - Bottom Layer" at 91.251,155.421 h1.52
  text "Pad" at 129.34,155.421 h1.52
  text "Rounded" at 144.322,155.421 h1.52
  text "(Mixed)" at 163.265,155.421 h1.52
  text "66.93mil (1.700mm)" at 287.993,155.421 h1.52
  text "43.31mil (1.100mm)" at 315.671,155.421 h1.52
  text "2" at 15.326,151.611 h1.52
  text "24.41mil (0.620mm)" at 30.562,151.611 h1.52
  text "NPTH" at 59.763,151.611 h1.52
  text "Round" at 72.612,151.611 h1.52
  text "Top Layer - Bottom Layer" at 91.251,151.611 h1.52
  text "Pad" at 129.34,151.611 h1.52
  text "Rounded" at 144.322,151.611 h1.52
  text "c0hn62m0mx0" at 163.265,151.611 h1.52
  text "-" at 287.993,151.611 h1.52
  text "-" at 315.671,151.611 h1.52
  text "4" at 15.326,147.801 h1.52
  text "31.89mil (0.810mm)" at 30.562,147.801 h1.52
  text "NPTH" at 59.763,147.801 h1.52
  text "Round" at 72.612,147.801 h1.52
  text "Top Layer - Bottom Layer" at 91.251,147.801 h1.52
  text "Pad" at 129.34,147.801 h1.52
  text "Rounded" at 144.322,147.801 h1.52
  text "c0hn81m0mx0" at 163.265,147.801 h1.52
  text "-" at 287.993,147.801 h1.52
  text "-" at 315.671,147.801 h1.52
  text "4" at 15.326,143.991 h1.52
  text "37.40mil (0.950mm)" at 30.562,143.991 h1.52
  text "PTH" at 59.763,143.991 h1.52
  text "Round" at 72.612,143.991 h1.52
  text "Top Layer - Bottom Layer" at 91.251,143.991 h1.52
  text "Pad" at 129.34,143.991 h1.52
  text "(Mixed)" at 144.322,143.991 h1.52
  text "(Mixed)" at 163.265,143.991 h1.52
  text "-" at 287.993,143.991 h1.52
  text "-" at 315.671,143.991 h1.52
  text "6" at 15.326,140.181 h1.52
  text "55.12mil (1.400mm)" at 30.562,140.181 h1.52
  text "PTH" at 59.763,140.181 h1.52
  text "Rectangle" at 72.612,140.181 h1.52
  text "Top Layer - Bottom Layer" at 91.251,140.181 h1.52
  text "Pad" at 129.34,140.181 h1.52
  text "Rectangle" at 144.322,140.181 h1.52
  text "r220_300h140_220m0mx0" at 163.265,140.181 h1.52
  text "86.61mil (2.200mm)" at 287.993,140.181 h1.52
  text "86.61mil (2.200mm)" at 315.671,140.181 h1.52
  text "10" at 15.326,136.371 h1.52
  text "122.05mil (3.100mm)" at 30.562,136.371 h1.52
  text "NPTH" at 59.763,136.371 h1.52
  text "Round" at 72.612,136.371 h1.52
  text "Top Layer - Bottom Layer" at 91.251,136.371 h1.52
  text "Pad" at 129.34,136.371 h1.52
  text "Rounded" at 144.322,136.371 h1.52
  text "c0hn310m10mx10p0" at 163.265,136.371 h1.52
  text "-" at 287.993,136.371 h1.52
  text "-" at 315.671,136.371 h1.52
  text "15" at 15.326,132.561 h1.52
  text "39.37mil (1.000mm)" at 30.562,132.561 h1.52
  text "PTH" at 59.763,132.561 h1.52
  text "Round" at 72.612,132.561 h1.52
  text "Top Layer - Bottom Layer" at 91.251,132.561 h1.52
  text "Pad" at 129.34,132.561 h1.52
  text "Rounded" at 144.322,132.561 h1.52
  text "c200h100m0mx0" at 163.265,132.561 h1.52
  text "-" at 287.993,132.561 h1.52
  text "-" at 315.671,132.561 h1.52
  text "21" at 15.326,128.751 h1.52
  text "157.00mil (3.988mm)" at 30.562,128.751 h1.52
  text "NPTH" at 59.763,128.751 h1.52
  text "Round" at 72.612,128.751 h1.52
  text "Top Layer - Bottom Layer" at 91.251,128.751 h1.52
  text "Pad" at 129.34,128.751 h1.52
  text "Rounded" at 144.322,128.751 h1.52
  text "c0hn399m0mx0p0" at 163.265,128.751 h1.52
  text "-" at 287.993,128.751 h1.52
  text "-" at 315.671,128.751 h1.52
  text "42" at 15.326,124.941 h1.52
  text "67.00mil (1.702mm)" at 30.562,124.941 h1.52
  text "NPTH" at 59.763,124.941 h1.52
  text "Round" at 72.612,124.941 h1.52
  text "Top Layer - Bottom Layer" at 91.251,124.941 h1.52
  text "Pad" at 129.34,124.941 h1.52
  text "Rounded" at 144.322,124.941 h1.52
  text "c0hn170m0mx0p0" at 163.265,124.941 h1.52
  text "-" at 287.993,124.941 h1.52
  text "-" at 315.671,124.941 h1.52
  text "42" at 15.326,121.131 h1.52
  text "118.11mil (3.000mm)" at 30.562,121.131 h1.52
  text "NPTH" at 59.763,121.131 h1.52
  text "Round" at 72.612,121.131 h1.52
  text "Top Layer - Bottom Layer" at 91.251,121.131 h1.52
  text "Pad" at 129.34,121.131 h1.52
  text "Rounded" at 144.322,121.131 h1.52
  text "c0hn300m0mx0p0" at 163.265,121.131 h1.52
  text "-" at 287.993,121.131 h1.52
  text "-" at 315.671,121.131 h1.52
  text "199" at 15.326,117.321 h1.52
  text "11.81mil (0.300mm)" at 30.562,117.321 h1.52
  text "PTH" at 59.763,117.321 h1.52
  text "Round" at 72.612,117.321 h1.52
  text "Top Layer - Bottom Layer" at 91.251,117.321 h1.52
  text "Via" at 129.34,117.321 h1.52
  text "Rounded" at 144.322,117.321 h1.52
  text "(Mixed)" at 163.265,117.321 h1.52
  text "-" at 287.993,117.321 h1.52
  text "-" at 315.671,117.321 h1.52
  text "349 Total" at 15.326,113.511 h1.52
  text "Slot definitions :" at 2.476,109.829 h1.52
  text "Routed Path Length" at 28.707,109.829 h1.52
  text "= Calculated from tool start centre position to tool end centre position." at 56.715,109.829 h1.52
  text "Hole Length" at 28.707,107.289 h1.52
  text "= Routed Path Length + Tool Size = Slot length as defined in the PCB layout" at 46.304,107.289 h1.52

## Dimensions
276.403,81.28 to 276.403,0 on Mechanical 1
0,78.283 to 279.4,78.283 on Mechanical 1

## Text inside footprints (layer, text, board x,y; h text height)
J1: Mechanical 13 "PCB Edge" at 141.047,80.697 h0.8 r180
LED1: Bottom Overlay "-" at 94.541,79.029 h0.5 r180; Bottom Overlay "+" at 92.509,79.029 h0.5 r180
LED2: Bottom Overlay "-" at 2.251,42.048 h0.5 r270; Bottom Overlay "+" at 2.251,40.016 h0.5 r270
LED3: Bottom Overlay "-" at 91.725,2.251 h0.5; Bottom Overlay "+" at 93.757,2.251 h0.5
LED4: Bottom Overlay "-" at 184.844,2.251 h0.5; Bottom Overlay "+" at 186.876,2.251 h0.5
LED5: Bottom Overlay "-" at 277.148,39.031 h0.5 r90; Bottom Overlay "+" at 277.148,41.063 h0.5 r90
LED6: Bottom Overlay "-" at 187.66,79.029 h0.5 r180; Bottom Overlay "+" at 185.628,79.029 h0.5 r180
R19: Top Overlay "S" at 253.547,65.506 h1; Top Overlay "W" at 258.602,65.506 h1; Top Overlay "B" at 256.011,54.838 h1; Top Overlay "A" at 253.471,54.838 h1; Top Overlay "C" at 258.576,54.838 h1
R35: Top Overlay "S" at 253.547,45.486 h1; Top Overlay "W" at 258.602,45.486 h1; Top Overlay "B" at 256.011,34.818 h1; Top Overlay "A" at 253.471,34.818 h1; Top Overlay "C" at 258.576,34.818 h1
R42: Top Overlay "S" at 253.547,25.466 h1; Top Overlay "W" at 258.602,25.466 h1; Top Overlay "B" at 256.011,14.798 h1; Top Overlay "A" at 253.471,14.798 h1; Top Overlay "C" at 258.576,14.798 h1
SW22: Top Overlay "PCB Edge" at 123.85,80.858 h0.3 r180
SW24: Top Overlay "PCB Edge" at 116.102,80.858 h0.3 r180